# Altium PCB Breakout_PCB.PcbDoc
Units mm, origin at the board's own origin, x right, y up, seen from the top; angles counter-clockwise.
Board outline 36.7 x 36.7 mm, 2 copper layers (Top Layer, Bottom Layer), stack 1.569 mm thick; 26 components, 24 nets, 122 pads, 17 vias.
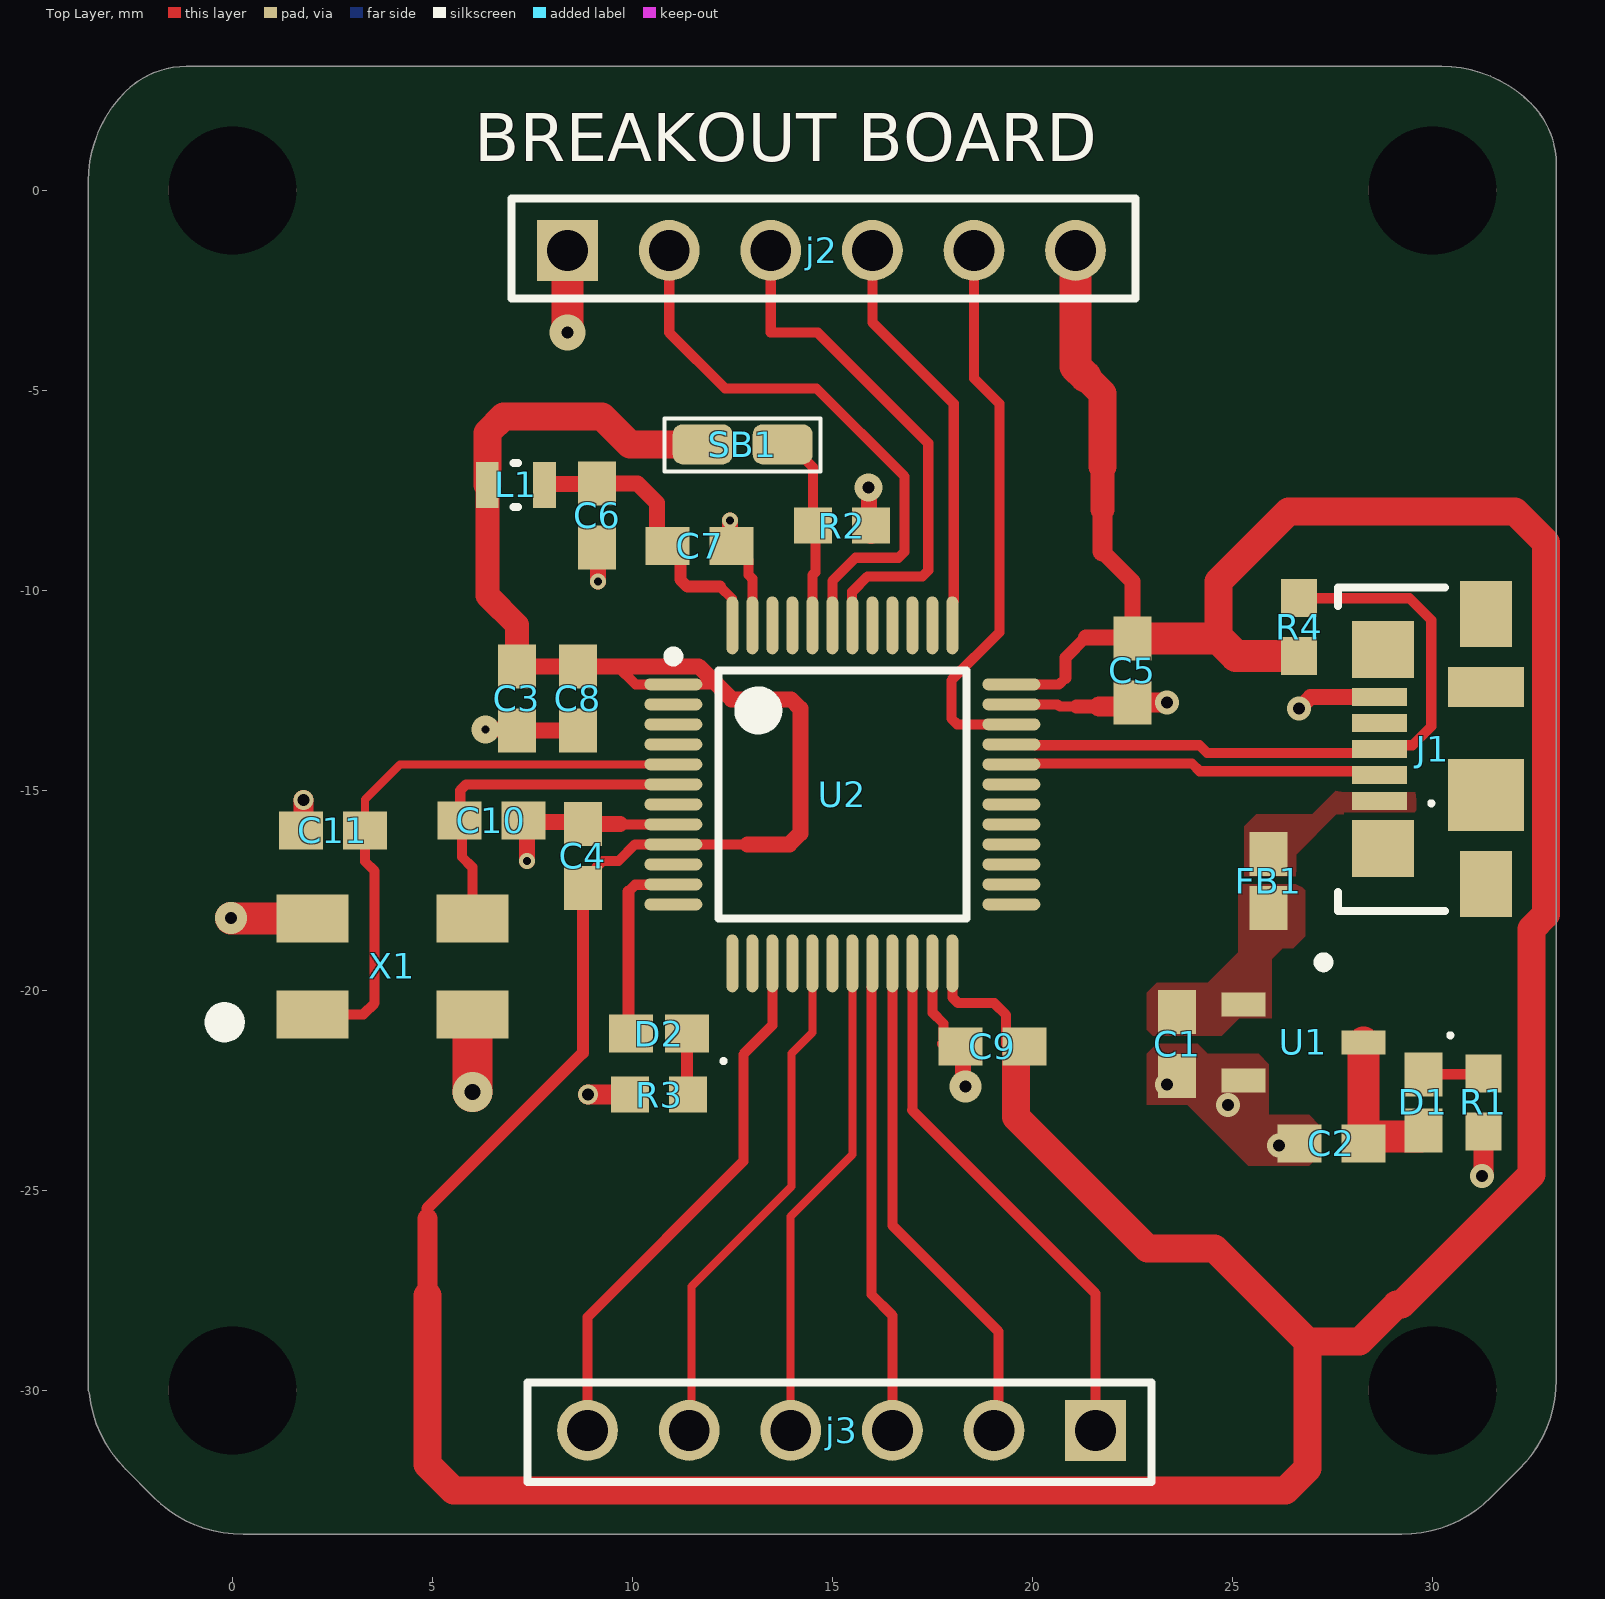
[diagram p0: Top Layer view]
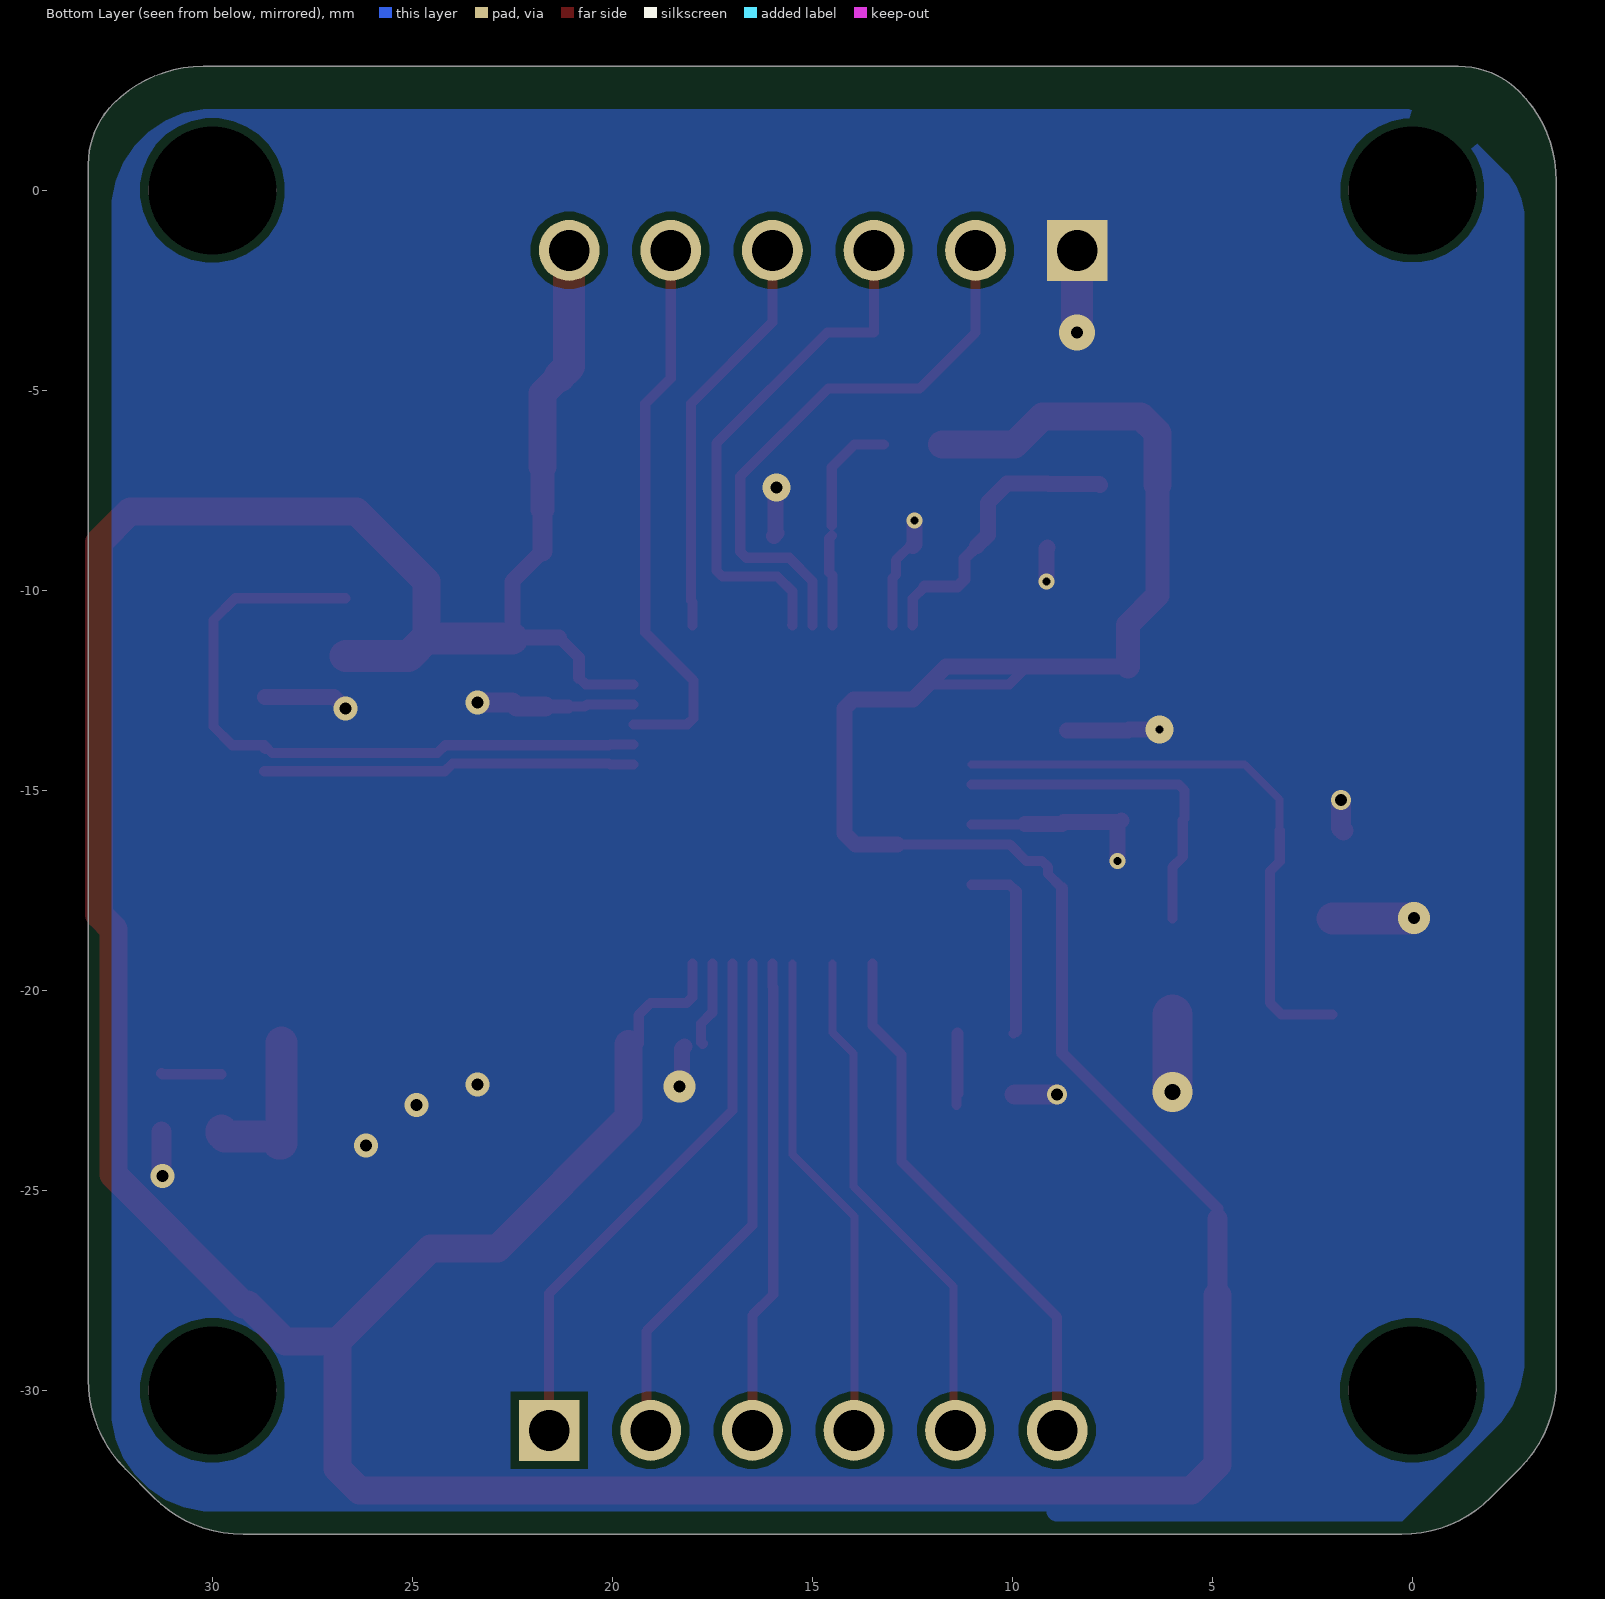
[diagram p1: Bottom Layer view, seen from below]
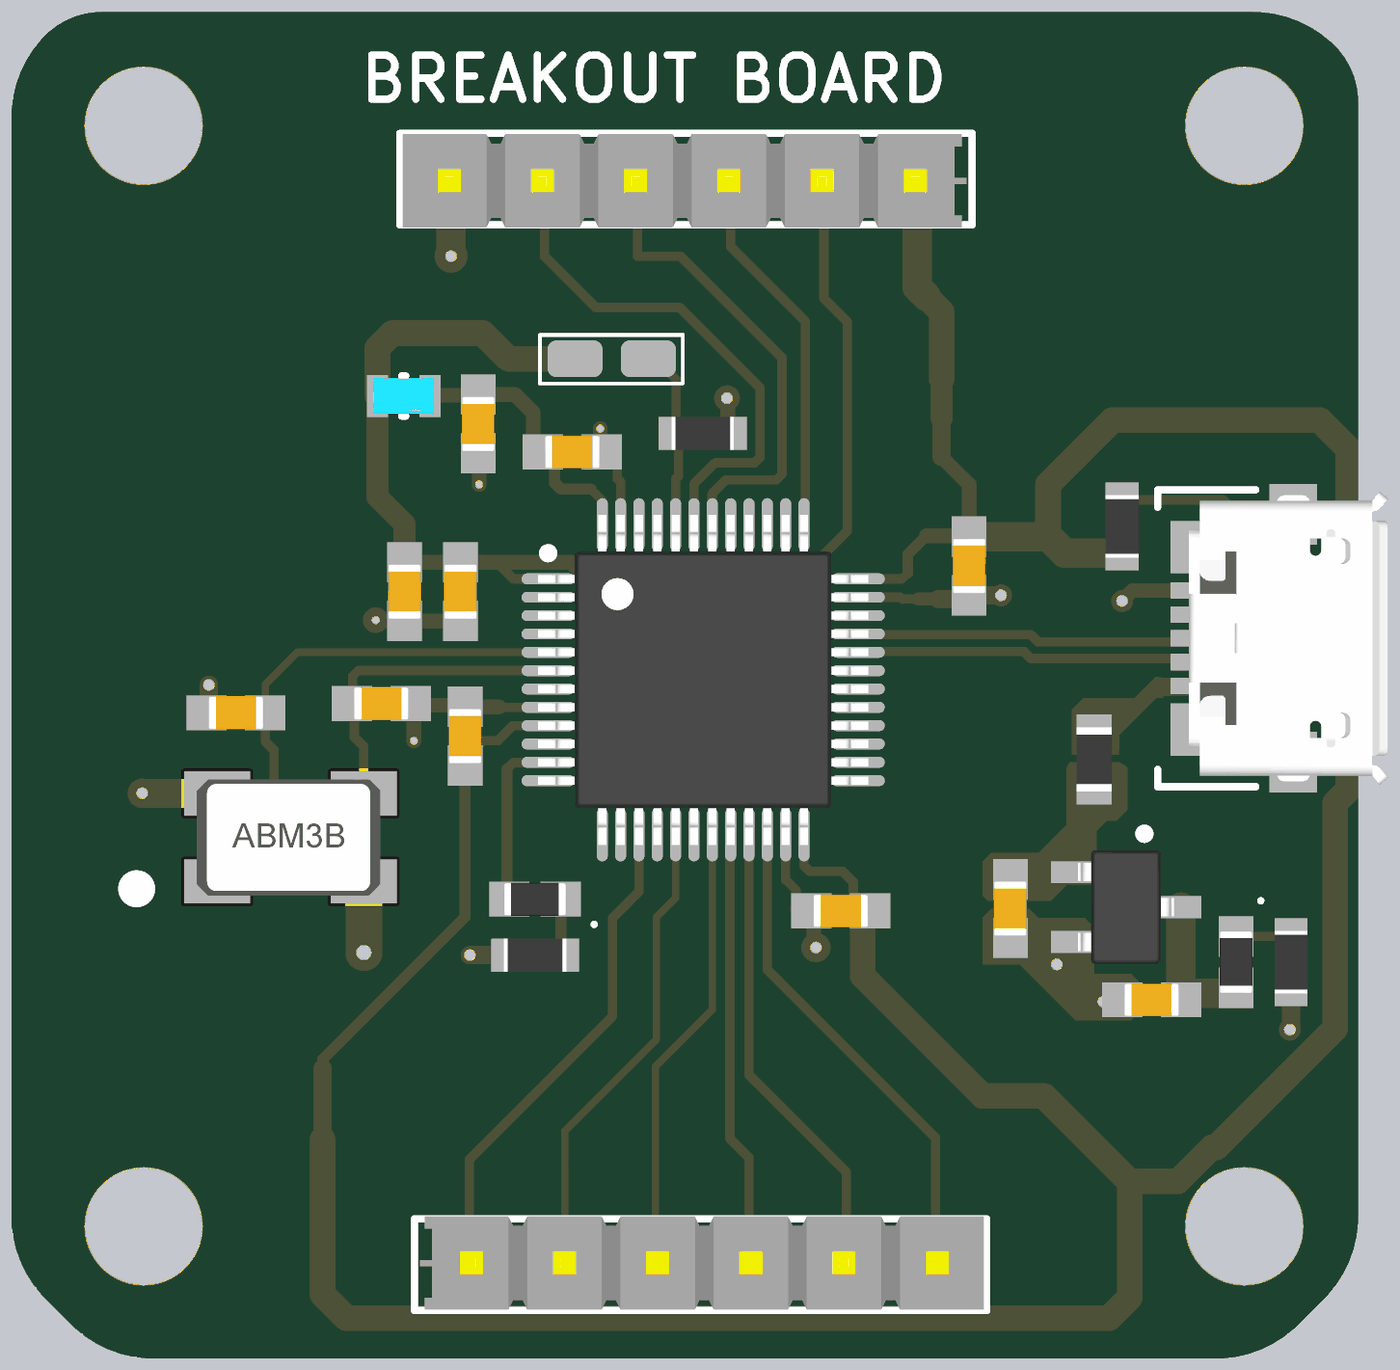
[diagram p2: 3D render of the assembled board from above, using the file's embedded part models]

## Layer stack, top to bottom
Top Solder: solder mask 0.0254, SM-001, Dk 4
Top Layer: signal copper 0.035
Dielectric 1: core 1.4986, Core-043, Dk 4.3
Bottom Layer: signal copper 0.035
Bottom Solder: solder mask 0.0254, SM-001, Dk 4

## Board outline
-2.673,-31.969 cw(c-0.434,-29.73) -3.584,-30.056 -3.6,-30 -3.6,0.23 cw(c-0.434,0.23) -2.673,2.469 cw(c-1.149,0.945) -1.149,3.1 30.23,3.1 cw(c30.23,-0.066) 32.469,2.173 cw(c30.945,0.649) 33.1,0.649 33.1,-29.73 cw(c29.934,-29.73) 32.173,-31.969 31.469,-32.673 cw(c29.23,-30.434) 29.23,-33.6 0.27,-33.6 cw(c0.27,-30.434) -1.969,-32.673

## Design rules (kind name [scope] priority, off if disabled: settings)
Clearance [All] p1: gap=0.2 ignorepadtopadclearanceinfootprint=FALSE
DiffPairsRouting [All] p1: maxlimit=0.2 minlimit=0.2 mostfreqgap=0.2 toplayer_minwidth=0.254 toplayer_maxwidth=0.254 toplayer_prefwidth=0.254 bottomlayer_minwidth=0.254 bottomlayer_maxwidth=0.254 bottomlayer_prefwidth=0.254 impedanceprofiledriven=TRUE impedanceprofileid={1AD16B77-0AF7-4E02-9700-B367DFB50BE7} impedanceprofilevalue=90.000000 maxuncoupledlength=12.7
HoleSize [All] p1: absolutevalues=TRUE maxlimit=4 minlimit=0.2 maxpercent=80.000 minpercent=20.000
MinimumSolderMaskSliver [All] p1: minsoldermaskwidth=0.1
PolygonConnect [All] p1: connectstyle=Direct reliefconductorwidth=0.254 reliefentries=4 polygonreliefangle="90 Angle" airgapwidth=0.254
RoutingVias [All] p1: holewidth=0.711 width=1.5 viastyle="Through Hole" minholewidth=0.2 minwidth=1.27 maxholewidth=0.254 maxwidth=1
SilkToSolderMaskClearance [IsPad] p1: minsilkscreentomaskgap=0.1 clearancetoexposedcopper=TRUE
SolderMaskExpansion [All] p1: expansion=0 istentingtop=FALSE
SupplyNets "Schematic Supply Nets_5" [InNet('3V3')] p1: voltage=0.000
SupplyNets "Schematic Supply Nets_4" [InNet('VBUS')] p2: voltage=0.000
SupplyNets "Schematic Supply Nets_3" [InNet('+5V')] p3: voltage=0.000
SupplyNets "Schematic Supply Nets_2" [InNet('+3V3')] p4: voltage=0.000
SupplyNets "Schematic Supply Nets_1" [InNet('GND')] p5: voltage=0.000
SupplyNets "Schematic Supply Nets" [InNet('+3V3A')] p6: voltage=0.000
UnRoutedNet [All] p1: checkbadconnections=TRUE
Width [All] p1: maxlimit=1 minlimit=0.2 preferedwidth=0.254 minimp=50.000000 maximp=50.000000 favimp=50.000000
25 further rules are at their usual default settings.

## Classes and differential pairs
differential pair USB_D: +USB_D_P -USB_D_N

## Components (designator, comment, footprint, x,y, rotation, side; value= is the part's Value field where it differs from the comment)
C1 "1u" CAP_0603 23.622,-21.336 r90 top
C2 "1u" CAP_0603 27.475,-23.825 r0 top
C3 "4u7" CAP_0603 7.112,-12.7 r90 top
C4 "100n" CAP_0603 8.763,-16.637 r270 top
C5 "100n" CAP_0603 22.5,-12 r90 top
C6 "1u" CAP_0603 9.12,-8.128 r90 top
C7 "100n" CAP_0603 11.684,-8.89 r180 top
C8 "100n" CAP_0603 8.636,-12.7 r90 top
C9 "100n" CAP_0603 19,-21.4 r0 top
C10 "26p" CAP_0603 6.477,-15.748 r180 top
C11 "26p" CAP_0603 2.516,-16.002 r0 top
D1 "Green LED" DIOC1608X08N 29.776,-22.798 r90 top
D2 "cathodepin2" DIOC1608X08N 10.668,-21.082 r0 top
FB1 "120R" "Ferrite bead" 25.908,-17.272 r270 top
J1 "473460001" FP-473460001-MFG 30.988,-13.97 r90 top
j2 "TSW-106-07-G-S" "Header 1X6"#1 8.38,-1.5 r0 top
j3 "TSW-106-07-G-S" "Header 1X6"#2 21.58,-31 r180 top
L1 "LQW18AN27NJ8ZD" FP-LQW18AN_80-MFG 7.088,-7.366 r0 top
R1 "RES_0603" RESC1608X08N 31.276,-22.798 r90 top
R2 "RES_0603" RESC1608X08N 15.24,-8.382 r180 top
R3 "RES_0603" RESC1608X08N 10.668,-22.606 r180 top
R4 "RES_0603" RESC1608X08N 26.67,-10.922 r90 top
SB1 "SolderJumper" SolderJumper 13.758,-6.35 r180 top
U1 "XC206" SOT95P280X120-3N 26.776,-21.298 r0 top
U2 "STM3232f103c8t6" TSQFP50P900X900X160-48N 15.25,-15.101 r0 top
X1 "XTAL_AMB" "XTAL - AMB" 4,-19.4 r0 top

## Footprints (in the part's own frame and the unit in brackets; to place one, negate y for a bottom-side part, rotate by r counter-clockwise, add the part's x,y. Pads: shape width x height; smd on the part's side, far side on the other; paste and mask are expansions set on the pad)
CAP_0603 [mm] "Chip Capacitor, 2-Leads, Body 1.60x0.80mm, IPC Medium Density"
  rect 1.1x0.95 smd: 1(-0.8,0) 2(0.8,0)
  body extent -0.75,-0.45 0.75,0.45, height 0.9
DIOC1608X08N [mm] "Chip Diode, 2-Leads, Body 1.60x0.80mm, IPC Medium Density"
  rect 1.1x0.95 smd: 1(-0.7,0) 2(0.7,0)
  silkscreen extent 1.62,-0.72 1.72,-0.62, body extent -0.85,-0.45 0.85,0.45, height 0.75
"Ferrite bead" [mm] "FERRITE BEAD 470 OHM 0603 1LN"
  rect 1.1x0.95 smd: 1(-0.675,0) 2(0.675,0)
  body extent -0.87,-0.48 0.87,0.48, height 0.75
FP-473460001-MFG [mm]
  rect 0.45x1.38 smd paste+0 mask+0: 1(-1.3,2.31) 2(-0.65,2.31) 3(0,2.31) 4(0.65,2.31) 5(1.3,2.31)
  rect 1.425x1.55 smd paste+0 mask+0: 6(-2.488,2.225) 7(2.488,2.225)
  rect 1.65x1.3 smd paste+0 mask+0: 8(-3.375,-0.35) 11(3.375,-0.35)
  rect 1.8x1.9 smd paste+0 mask+0: 9(-1.15,-0.35)
  rect 1x1.9 smd paste+0 mask+0: 10(1.55,-0.35)
  silkscreen extent -4.05,0.67 4.05,3.35, body extent -3.99,-2.93 3.99,2.5, height 2.98
FP-LQW18AN_80-MFG [mm]
  rect 0.57x1.15 smd paste+0 mask+0: 1(-0.715,0) 2(0.715,0)
  silkscreen extent -0.06,-0.55 0.06,0.55, body extent -1.1,-0.67 1.1,0.67, height 0.25
"Header 1X6"#1 [mm]
  rect 1.52x1.52 hole 1.02 unplated paste-2539.97 mask+0.1: 1(0,0)
  round 1.52 hole 1.02 mask+0.1: 2(2.54,0) 3(5.08,0) 4(7.62,0) 5(10.16,0) 6(12.7,0)
  silkscreen extent -1.4,-1.2 14.2,1.29, body extent -1.32,-1.27 14.05,1.27, height 8.39
"Header 1X6"#2 [mm]
  rect 1.52x1.52 hole 1.02 paste-2539.97 mask+0.1: 1(0,0)
  round 1.52 hole 1.02 mask+0.1: 2(2.54,0) 3(5.08,0) 4(7.62,0) 5(10.16,0) 6(12.7,0)
  silkscreen extent -1.4,-1.2 14.2,1.29, body extent -1.32,-1.27 14.05,1.27, height 8.39
RESC1608X08N [mm] "Chip Resistor, 2-Leads, Body 1.60x0.80mm, IPC Medium Density"
  rect 0.95x0.9 smd: 1(-0.725,0) 2(0.725,0)
  body extent -0.85,-0.45 0.85,0.45, height 0.8
SolderJumper [mm]
  rrect50% 1.5x1 smd mask+0: 1(0,0) 2(2,0)
SOT95P280X120-3N [mm] "SOT23, 3-Leads, Body 2.90x2.80mm, Pitch 0.95mm, IPC Medium Density"
  rect 1.1x0.6 smd: 1(-1.5,0.95) 2(-1.5,-0.95) 3(1.5,0)
  silkscreen extent 0.38,1.88 0.63,2.12, body extent -1.31,-1.55 1.31,1.55, height 1.2
TSQFP50P900X900X160-48N [mm] "TSQFP, 48-Leads, Body 7.00x7.00mm, Pitch 0.50mm, IPC Medium Density"
  oval 1.45x0.3 smd: 1(-4.225,2.75) 2(-4.225,2.25) 3(-4.225,1.75) 4(-4.225,1.25) 5(-4.225,0.75) 6(-4.225,0.25) 7(-4.225,-0.25) 8(-4.225,-0.75) 9(-4.225,-1.25) 10(-4.225,-1.75) 11(-4.225,-2.25) 12(-4.225,-2.75) 25(4.225,-2.75) 26(4.225,-2.25) 27(4.225,-1.75) 28(4.225,-1.25) 29(4.225,-0.75) 30(4.225,-0.25) 31(4.225,0.25) 32(4.225,0.75) 33(4.225,1.25) 34(4.225,1.75) 35(4.225,2.25) 36(4.225,2.75)
  oval 0.3x1.45 smd: 13(-2.75,-4.225) 14(-2.25,-4.225) 15(-1.75,-4.225) 16(-1.25,-4.225) 17(-0.75,-4.225) 18(-0.25,-4.225) 19(0.25,-4.225) 20(0.75,-4.225) 21(1.25,-4.225) 22(1.75,-4.225) 23(2.25,-4.225) 24(2.75,-4.225) 37(2.75,4.225) 38(2.25,4.225) 39(1.75,4.225) 40(1.25,4.225) 41(0.75,4.225) 42(0.25,4.225) 43(-0.25,4.225) 44(-0.75,4.225) 45(-1.25,4.225) 46(-1.75,4.225) 47(-2.25,4.225) 48(-2.75,4.225)
  silkscreen extent -4.35,-3.1 3.1,3.57, body extent -4.5,-4.5 4.5,4.5, height 1.6
"XTAL - AMB" [mm]
  rect 1.8x1.2 smd mask+0.08: 1(-2,-1.2) 2(2,-1.2) 3(-2,1.2) 4(2,1.2)
  silkscreen extent -4.44,-1.65 -3.94,-1.14, body extent -2.55,-1.59 2.45,1.59, height 1.11

## Part data
C1 C2 C3 C4 C5 C6 C7 C8 C9 C10 C11: library part CAP_0603, "Capacitor SMD Generic"
D1: "GREEN LED  0603"
D2: library part "BLUE LED", "Blue led 0603", Manufacturer="Cree LED", Manufacturer Part Number=XQAROY-00-0000-000000603
FB1: library part "FB 0603", "Generric ferrite bead 0603"
J1: library part CMP-2000-05246-2, "CONN RCPT USB2.0 MICRO B SMD R/A", Current Rating=1.8A, Manufacturer=Molex, Package=0, Temperature="-30°C to +85°C", Temperature Range High=+85°C, Temperature Range Low=-30°C, Voltage Rating=30V, Automotive=No, Category=Conn, ComponentLink2Description=Datasheet, ComponentLink2URL=https://www.molex.com/webdocs/datasheets/pdf/en-us/0473460001_IO_CONNECTORS.pdf, Conn Orientation="Right Angle", Contact Material=Gold,Nickel, Device Class L1=Connectors, Device Class L2="USB Connectors", Device Class L3=unset, Digikey Description="CONN RCPT USB2.0 MICRO B SMD R/A", Footprint Url=https://www.molex.com/pdm_docs/sd/473460001_sd.pdf, Height=2.945mm, Is Female=yes, Lead Free=Yes, Manufacturer Part Number=473460001, Number Of Contacts=5, Octopart=https://octopart.com/47346-0001-molex-7164928, Pitch=0.65mm, RoHS=TRUE, Shielding=true, Usb Standard="USB 2.0"
j2 j3: "CONN HEADER VERT 6POS 2.54MM", Manufacturer="Samtec Inc.", Manufacturer Part Number=TSW-106-07-G-S
L1: library part CMP-06042-008987-1, "Wire Wound RF Inductor for Automotive 27nH ±5% 1200mA 0.098Ω 0603 (1608)", Case/Package=0603, Current Rating=1.2A, DC Resistance (DCR)=98mR, Inductance=27nH, Max Operating Temperature=125°C, Min Operating Temperature=-55°C, Ratings=AEC-Q200, Resistor Type=Wirewound, Self Resonant Frequency=3.6GHz, Test Frequency=100MHz, Tolerance=5%, Core Material=Non-Magnetic, Mount="Surface Mount", Packaging="Cut Tape", Shielding=Unshielded
R1 R2 R3 R4: library part RES-0603, "Reesitor SMD Generic", Manufacturer="FH (Guangdong Fenghua Advanced Tech)", Manufacturer Part Number=RS-03L2R7JT
U1: "-40℃~+85℃@(Ta) 1 1uA 200mA 3.3V 6V Fixed Over Current Protection Positive SOT-23-3L Voltage Regulators - Linear, Low Drop Out (LDO) Regulators ROHS", Manufacturer="Torex Semicon", Manufacturer Part Number=XC6206P332MR-G
U2: "STM32 STM32f103c8t6 MCU", Manufacturer=STM32, Manufacture part number=STM3232f103c8t6
X1: library part XTAL-AMB, "CRYSTAL 8.0000MHZ 18PF SMD", Manufacturer="Abracon LLC", Manufacturer Part Number=535-9720-2-ND

## Free pads (board coordinates)
  oval 3.2x1.52 hole 3.2 mask+0: MH(0,-30) MH(0,0) MH(30,-30) MH(30,0)

## Via types
v1: diameter 0.6, hole 0.3, Top Layer to Bottom Layer, tented both sides, 6 vias
v2: diameter 0.4, hole 0.2, Top Layer to Bottom Layer, tented both sides, 3 vias
v3: diameter 0.8, hole 0.3, Top Layer to Bottom Layer, tented both sides, 2 vias
v4: diameter 0.5, hole 0.3, Top Layer to Bottom Layer, tented both sides, 2 vias
v5: diameter 0.7, hole 0.2, Top Layer to Bottom Layer, tented both sides, 1 vias
v6: diameter 0.7, hole 0.3, Top Layer to Bottom Layer, tented both sides, 1 vias
v7: diameter 0.9, hole 0.3, Top Layer to Bottom Layer, tented both sides, 1 vias
v8: diameter 1, hole 0.4, Top Layer to Bottom Layer, tented both sides, 1 vias

## Nets (pads, with @x,y where several pads share a name; then routed paths per layer and width w, separated by ;. In a path a pad name is that pad's centre, name@x,y a point inside that pad or via, vN(x,y) a via of type N, cw(c..) or ccw(c..) an arc to the next point about the centre after c; other vN are vias at no path point)
3V3: C2.2 D1.1 U1.3 | length 4.3
  Top Layer w0.8: U1.3 28.275,-23.75 C2.2@28.312,-23.787 ; C2.2@28.35,-23.75 C2.2@28.312,-23.787 ; D1.1 29.776,-23.573 29.701,-23.648 28.527,-23.648 C2.2@28.35,-23.825 ; C2.2@28.312,-23.787 C2.2@28.35,-23.825 ; C2.2@28.312,-23.787 C2.2 C2.2@28.35,-23.825
+3V3: C3.2 C4.2 C5.2 C8.2 C9.2 j2.6 L1.1 R4.1 SB1.2 U2.1 U2.9 U2.24 U2.36 | length 140
  Top Layer w0.254: C4.2 9.111,-17.089 9.111,-16.913 9.26,-16.764 9.652,-16.764 10.065,-16.351 U2.9 U2.9 12.875,-16.35 ; 9.626,-11.9 10.077,-12.351 U2.1 12.029,-12.351 12.068,-12.313 ; U2.24 18,-20.171 18.149,-20.32 19.05,-20.32 19.342,-20.612 C9.2@19.342,-21.336 ; U2.36 20.669,-12.351 20.828,-12.192
  Top Layer w0.3: 4.875,-25.7 4.875,-25.45 8.763,-21.562 C4.2 ; 20.828,-12.192 20.828,-11.684 21.336,-11.176
  Top Layer w0.4: C3.2 C8.2 9.626,-11.9 11.656,-11.9 12.068,-12.313 12.481,-12.725 13.966,-12.725 14.2,-12.959 14.2,-16.075 13.924,-16.351 12.876,-16.351 12.875,-16.35 ; 21.336,-11.176 22.476,-11.176 C5.2 22.5,-9.775 21.75,-9.025
  Top Layer w0.5: 4.875,-27.625 4.875,-25.7 ; 21.75,-9.025 21.75,-7.975
  Top Layer w0.6: L1.1 6.373,-10.123 7.112,-10.862 C3.2 ; 21.75,-7.975 21.75,-6.9
  Top Layer w0.7: 4.875,-27.625 4.875,-31.85 5.525,-32.5 26.325,-32.5 26.875,-31.95 26.875,-28.775 ; L1.1 6.373,-6.06 6.783,-5.65 9.245,-5.65 9.945,-6.35 SB1.2 ; C9.2@19.596,-21.336 19.596,-23.171 22.875,-26.45 24.55,-26.45 26.875,-28.775 ; 21.325,-4.65 21.75,-5.075 21.75,-6.9 ; 24.65,-11.2 24.65,-9.775 26.4,-8.025 32.065,-8.025 32.838,-8.798 32.838,-18.098 32.475,-18.461 32.475,-24.607 29.232,-27.85 29.109,-27.85 28.184,-28.775 26.875,-28.775
  Top Layer w0.8: j2.6 21.08,-4.405 21.325,-4.65 ; C5.2 24.65,-11.2 25.097,-11.647 R4.1
+3V3A: C6.2 C7.2 L1.2 U2.48 | length 7.3
  Top Layer w0.254: 12.192,-9.906 12.491,-10.205 12.491,-10.867 U2.48
  Top Layer w0.3: C7.2 11.2,-9.206 11.2,-9.73 11.376,-9.906 12.192,-9.906
  Top Layer w0.4: L1.2 7.822,-7.347 9.101,-7.347 C6.2 10.128,-7.328 10.615,-7.815 10.615,-8.621 C7.2
+5V: C1.2 FB1.2 U1.1
BOOT0: R2.2 SB1.1 U2.44 | length 5.3
  Top Layer w0.254: SB1.1@13.208,-6.35 SB1.1 13.941,-6.35 14.515,-6.924 R2.2 ; U2.44 14.5,-9.623 14.576,-9.547 14.576,-8.697 R2.2@14.515,-8.636
GND: C1.1 C2.1 C3.1 C4.1 C5.1 C6.1 C7.1 C8.1 C9.1 C10.1 C11.1 J1.5 j2.1 R1.1 R2.1 R3.2 U1.2 U2.8 U2.23 U2.35 U2.47 X1.2 X1.3 | length 30.5
  Top Layer w0.25: 9.687,-15.841 9.696,-15.851 U2.8
  Top Layer w0.254: C7.1 12.559,-8.89 12.907,-9.238 12.907,-9.616 13,-9.709 U2.47 ; 17.5,-20.561 17.5,-20.548 ; U2.23 17.5,-20.456 ; C9.1@17.742,-21.336 17.78,-21.298 17.78,-20.828 17.5,-20.548 ; U2.35 20.63,-12.851 20.687,-12.908 20.695,-12.9 21.106,-12.9 ; 17.5,-20.548 17.5,-20.456 ; 17.5,-20.548 17.5,-20.456
  Top Layer w0.35: 21.106,-12.9 21.663,-12.9 21.666,-12.903
  Top Layer w0.4: v5(6.325,-13.475) 7.087,-13.475 C3.1 C8.1 ; C10.1 C10.1@7.321,-15.792 ; v2(7.366,-16.764) 7.366,-15.837 C10.1@7.321,-15.792 ; C6.1 9.144,-8.952 v2(9.144,-9.779) ; 9.687,-15.841 8.767,-15.841 C4.1 8.718,-15.792 C10.1@7.321,-15.792 ; v2(12.446,-8.255) 12.446,-8.852 C7.1 ; v6(15.9,-7.425) 15.919,-7.444 15.919,-8.54 15.894,-8.565 R2.1@15.965,-8.636 ; C9.1 18.262,-21.462 18.262,-22.337 v3(18.325,-22.4) ; v1(26.67,-12.954) 26.954,-12.67 J1.5
  Top Layer w0.5: C11.1 1.778,-15.94 v4(1.778,-15.24) ; v4(8.89,-22.606) R3.2 ; 21.666,-12.903 22.397,-12.903 C5.1 v1(23.368,-12.8) ; v1(31.242,-24.638) 31.276,-24.604 R1.1
  Top Layer w0.8: v3(-0.037,-18.194) -0.032,-18.2 X1.3 ; j2.1 v7(8.38,-3.554) v7@8.382,-3.556
  Top Layer w1: X1.2 v8(6,-22.537) v8@6.01,-22.537
  other v1: 26.162,-23.876 24.892,-22.86 23.368,-22.352
HSE_IN: C10.2 U2.6 X1.4 | length 8.7
  Top Layer w0.254: X1.4 6,-16.922 5.742,-16.664 5.742,-15.748 5.698,-15.704 5.698,-15 5.848,-14.851 U2.6
HSE_OUT: C11.2 U2.5 X1.1 | length 14.9
  Top Layer w0.2: C11.2 3.316,-15.226 4.191,-14.351 U2.5
  Top Layer w0.254: X1.1 3.276,-20.6 3.556,-20.32 3.556,-17.018 3.316,-16.778 C11.2
LED_PWR_K: D1.2 R1.2 | length 1.5
  Top Layer w0.254: D1.2 31.251,-22.098 R1.2
LED_STAT_A: D2.1 U2.11 | length 4.8
  Top Layer w0.254: D2.1@9.906,-21.02 D2.1 ; 9.906,-17.526 10.072,-17.36 11.016,-17.36 U2.11
  Top Layer w0.3: D2.1@9.906,-21.02 9.906,-17.526
LED_STAT_K: D2.2 R3.1 | length 1.8
  Top Layer w0.254: R3.1@11.368,-22.581 R3.1 R3.1@11.393,-22.86
  Top Layer w0.3: R3.1@11.368,-22.581 D2.2
PA5: j3.6 U2.15 | length 13.6
  Top Layer w0.254: j3.6 8.88,-28.17 12.775,-24.275 12.775,-21.6 13.5,-20.875 U2.15
  Bottom Layer w0.254: j3.6 j3.6@8.89,-30.99
PA7: j3.5 U2.17 | length 12.9
  Top Layer w0.2: j3.5 11.475,-30.945 11.475,-27.4 13.975,-24.9 13.975,-21.575 14.5,-21.05 U2.17
PB1: j3.4 U2.19 | length 12.3
  Top Layer w0.2: j3.4 13.95,-30.99 13.95,-25.65 15.5,-24.1 U2.19
PB2: j3.3 U2.20 | length 11.9
  Top Layer w0.254: U2.20 16,-19.913 15.977,-19.936 15.977,-27.602 16.5,-28.125 j3.3
PB6: j2.3 U2.42 | length 13.3
  Top Layer w0.254: j2.3 13.46,-3.554 13.462,-3.556 14.635,-3.556 17.399,-6.32 17.399,-9.503 17.25,-9.652 15.875,-9.652 15.494,-10.033 U2.42@15.494,-10.87 ; U2.42@15.509,-10.867 U2.42 ; U2.42@15.494,-10.87 15.494,-10.876 U2.42 ; U2.42@15.494,-10.87 U2.42
PB7: j2.2 U2.43 | length 14.5
  Top Layer w0.254: j2.2 10.922,-1.502 10.922,-3.556 12.319,-4.953 14.605,-4.953 16.803,-7.151 16.803,-9.037 16.654,-9.185 15.58,-9.185 15,-9.765 U2.43
PB10: j3.2 U2.21 | length 12.8
  Top Layer w0.254: U2.21 16.5,-25.875 19.15,-28.525 19.15,-30.89 j3.2
PB11: j3.1 U2.22 | length 13.6
  Top Layer w0.254: 16.995,-22.995 21.575,-27.575 ; 17,-23 U2.22 ; j3.1 21.58,-27.58
SWCLK: j2.4 U2.37 | length 10.2
  Top Layer w0.254: j2.4 16,-3.3 18.034,-5.334 18.034,-10.255 18,-10.289 U2.37
SWDIO: j2.5 U2.34 | length 14
  Top Layer w0.254: j2.5 18.54,-3.554 ; 18.542,-3.556 18.54,-3.554 ; U2.34 18.124,-13.351 17.975,-13.202 17.975,-12.251 19.177,-11.049 19.177,-5.334 18.54,-4.697 18.54,-3.554
USB_D_N: J1.2 U2.32 | length 9.3
  Top Layer w0.254: U2.32 20.062,-14.351 20.085,-14.328 23.992,-14.328 24.186,-14.522 J1.2@28.702,-14.522
USB_D_P: J1.3 R4.2 U2.33 | length 17.1
  Top Layer w0.254: U2.33 20.062,-13.851 20.085,-13.874 24.18,-13.874 24.374,-14.068 28.508,-14.068 J1.3@28.702,-13.874 ; R4.2 29.427,-10.197 29.972,-10.742 29.972,-13.403 29.503,-13.872 28.776,-13.872 J1.3
VBUS: FB1.1 J1.1
pads on no net: J1.4 J1.6 J1.7 J1.8 J1.9 J1.10 J1.11 U2.2 U2.3 U2.4 U2.7 U2.10 U2.12 U2.13 U2.14 U2.16 U2.18 U2.25 U2.26 U2.27 U2.28 U2.29 U2.30 U2.31 U2.38 U2.39 U2.40 U2.41 U2.45 U2.46

## Polygon pours and split planes (outlines as drawn)
VBUS on Top Layer "VBUS_L01_P004" (solid, pour order 4): 25.3,-15.9 25.6,-15.6 27,-15.6 27.7,-14.9 29.5,-14.9 29.6,-15 29.6,-15.5 29.5,-15.6 27.6,-15.6 26.594,-16.606 26.594,-17.272 25.308,-17.272 25.3,-17.28 25.3,-16.7
+5V on Top Layer "+5V_L01_P002" (solid, pour order 2): 25.146,-17.272 25.146,-19.05 24.384,-19.812 23.114,-19.812 22.86,-20.066 22.86,-20.98 23.012,-21.133 24.74,-21.133 25.171,-20.701 25.984,-20.701 25.984,-19.228 26.264,-18.948 26.518,-18.948 26.822,-18.644 26.822,-17.501 26.594,-17.272 25.933,-17.272
GND on Top Layer "GND_L01_P001" (solid, pour order 1): 26.924,-24.384 27.178,-24.13 27.178,-23.368 26.924,-23.114 25.908,-23.114 25.908,-21.844 25.654,-21.59 24.384,-21.59 24.13,-21.336 23.114,-21.336 22.86,-21.59 22.86,-22.86 23.876,-22.86 25.4,-24.384
GND on Bottom Layer "GND_L02_P000" (solid, pour order 0): 0.254,-33.274 -2.05,-30.97 cw(c-0.254,-29.174) -2.794,-29.174 -2.794,-0.718 cw(c-1.06,-0.718) -2.286,0.508 -1.506,1.288 cw(c0.29,-0.508) 0.29,2.032 29.972,2.032 cw(c29.972,-0.508) 32.512,-0.508 32.512,-30.48 cw(c29.972,-30.48) 29.972,-33.02 9.144,-33.02 cw(c8.89,-33.02) 8.89,-33.274

## Silkscreen, mask and mechanical layers (free items; w line width, h text height)
Top Overlay:
  lines w0.1: 10.8,-7.025 10.8,-5.7 11.025,-5.7 14.7,-5.7 14.7,-7.025 10.8,-7.025
  text "BREAKOUT BOARD" at 6.053,0.725 h1.2
Mechanical 1:
  lines w0.2: -3.5,-30 -3.5,-20 -3.5,0.23 cw(c-0.434,0.23) -2.602,2.398 cw(c-1.149,0.945) -1.149,3 30.23,3 cw(c30.23,-0.066) 32.398,2.102 cw(c30.945,0.649) 33,0.649 33,-29.73 cw(c29.934,-29.73) 32.102,-31.898 31.398,-32.602 cw(c29.23,-30.434) 29.23,-33.5 0.27,-33.5 cw(c0.27,-30.434) -1.898,-32.602 -2.602,-31.898 cw(c-0.434,-29.73) -3.5,-29.73